# Altium PCB PCB1.PcbDoc
Units mil, origin at the board's own origin, x right, y up, seen from the top; angles counter-clockwise.
Board outline 1597.04 x 1186.19 mil, 2 copper layers (Top Layer, Bottom Layer); 38 components, 34 nets, 161 pads, 103 vias.
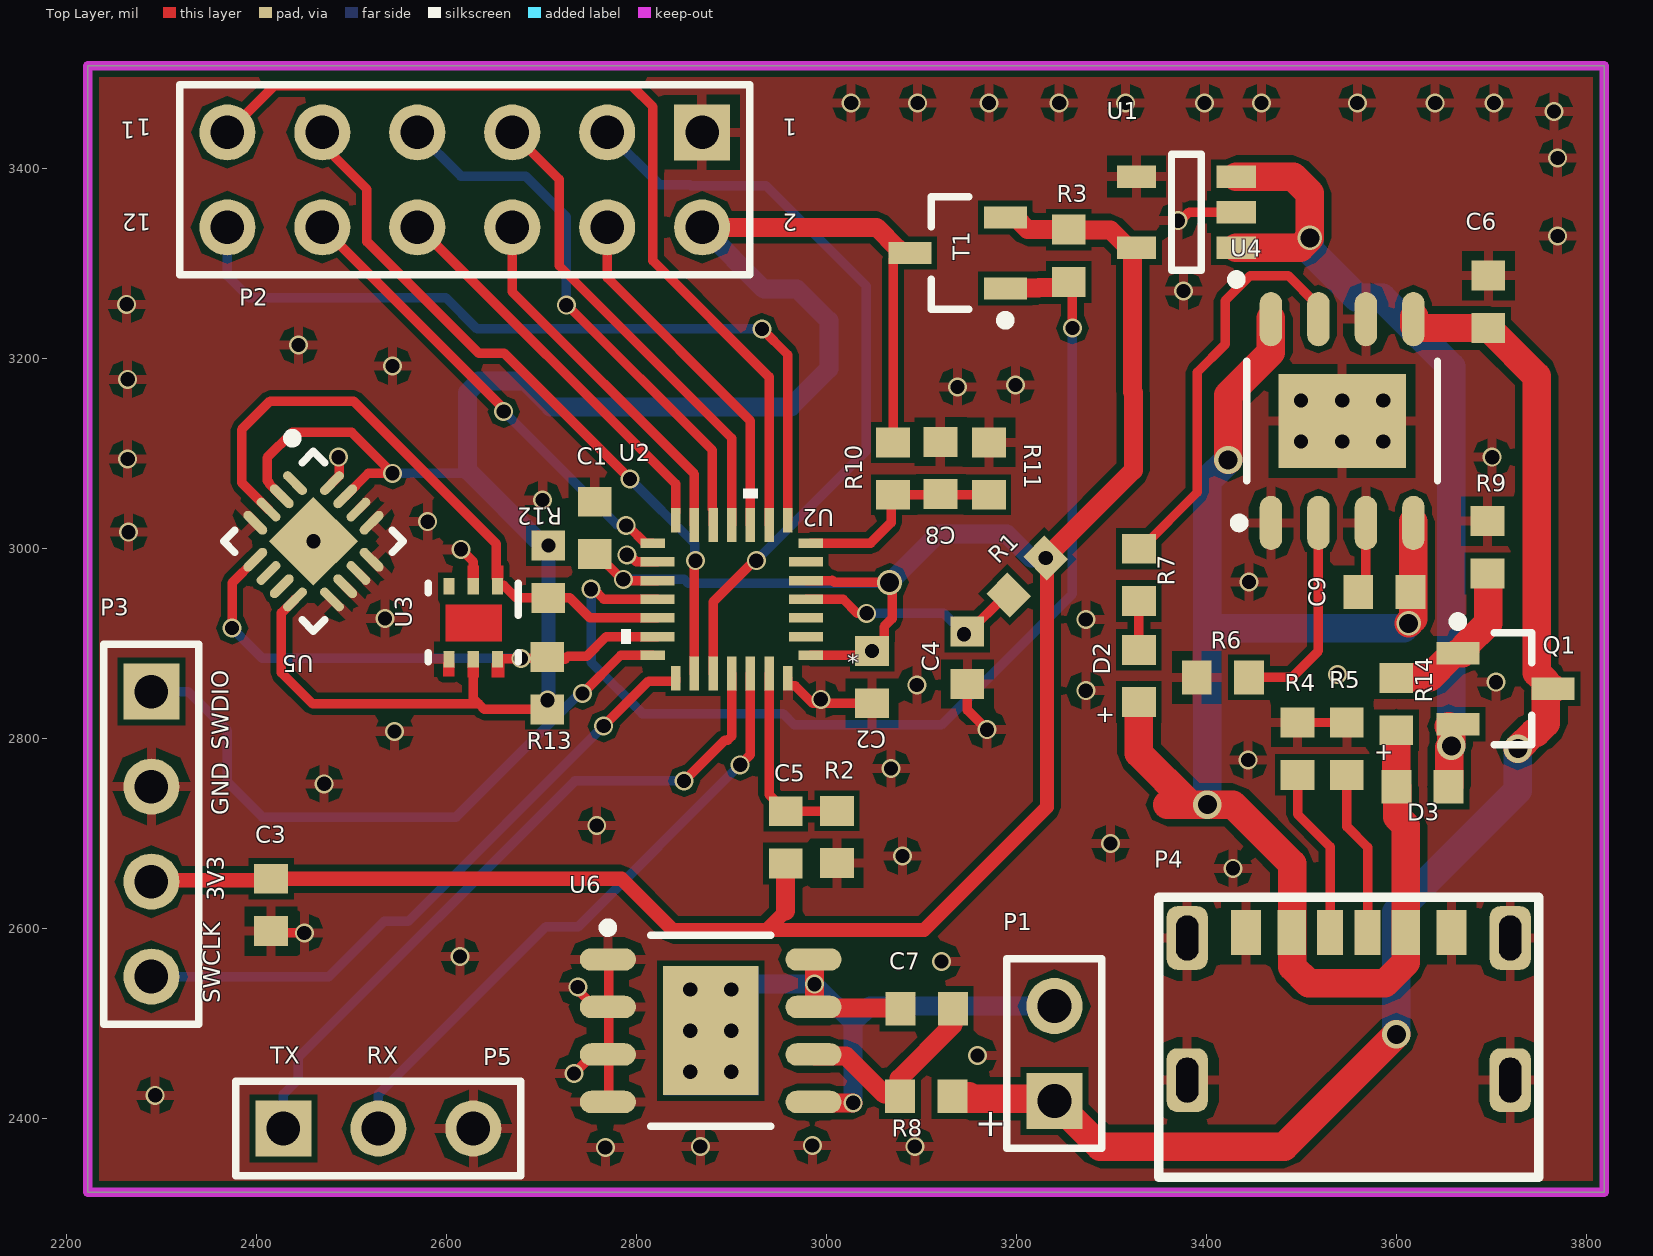
[diagram p0: Top Layer view]
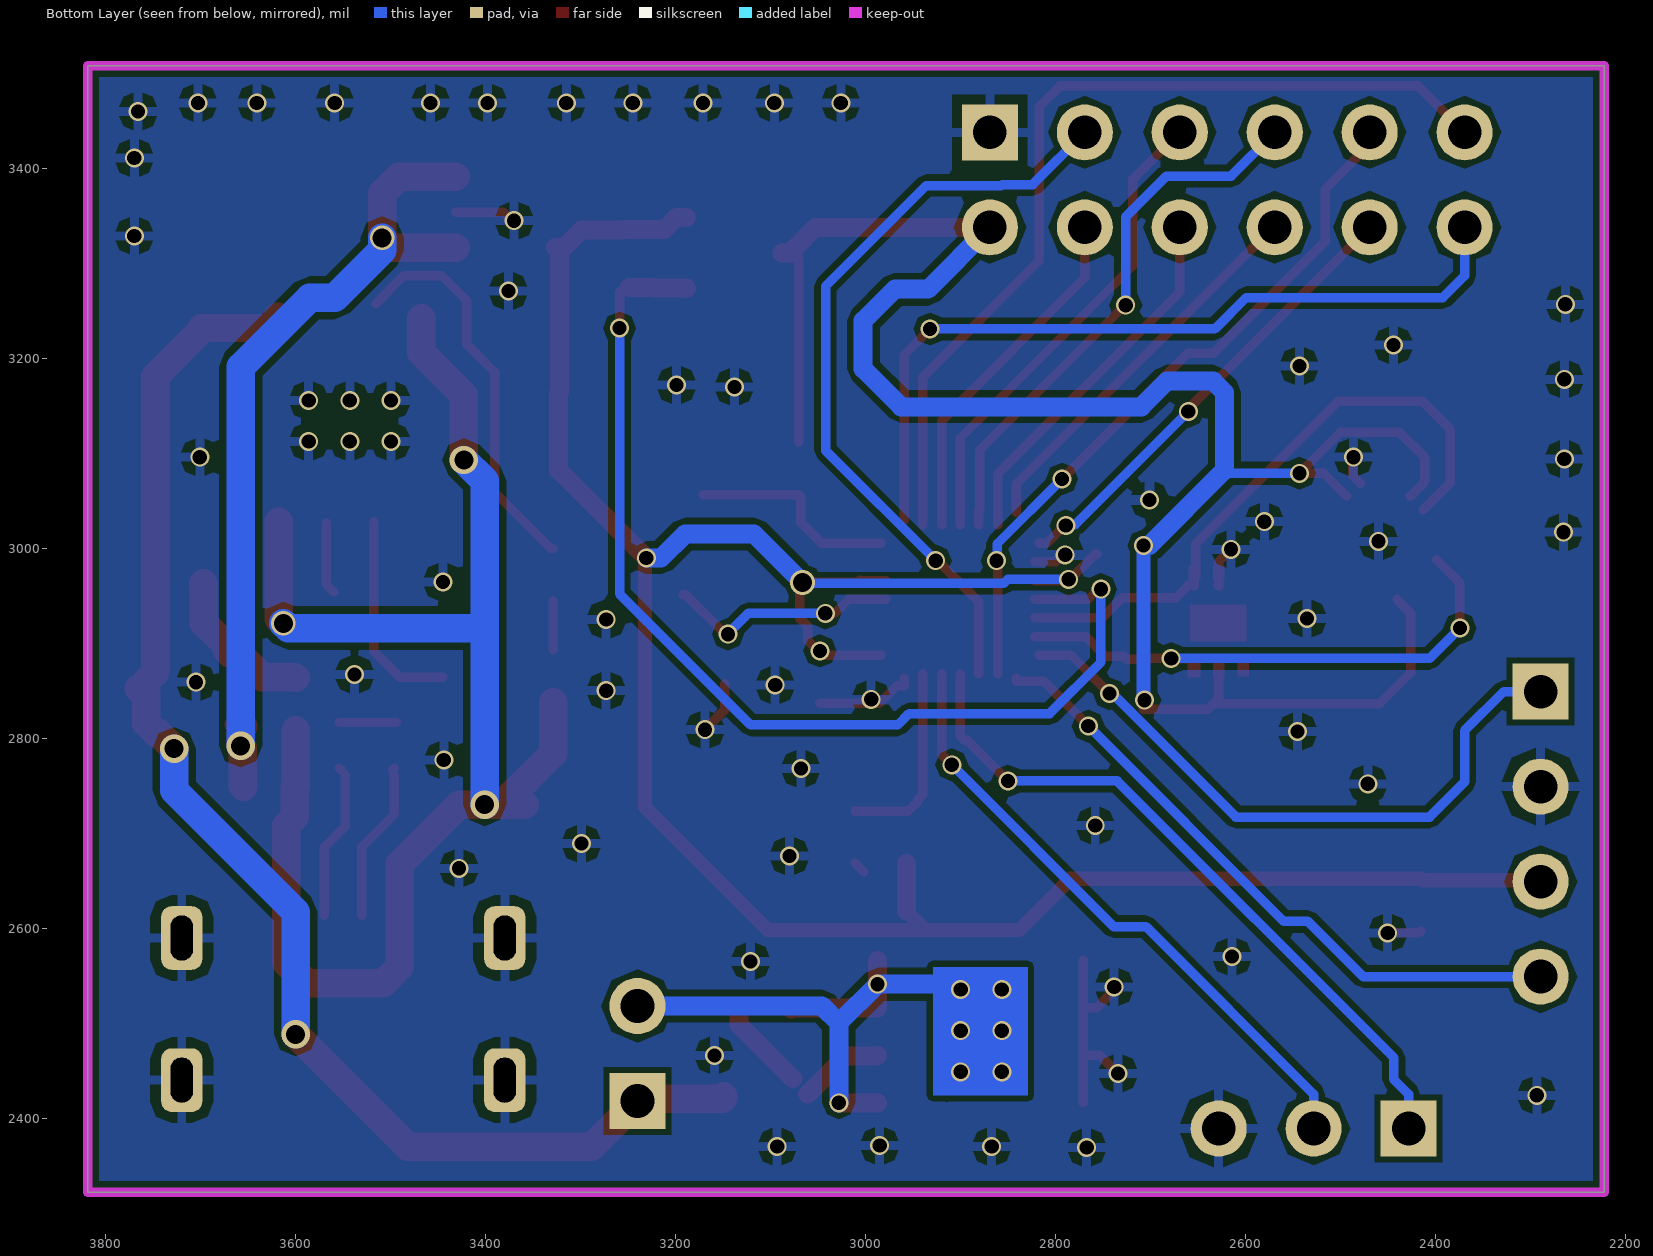
[diagram p1: Bottom Layer view, seen from below]
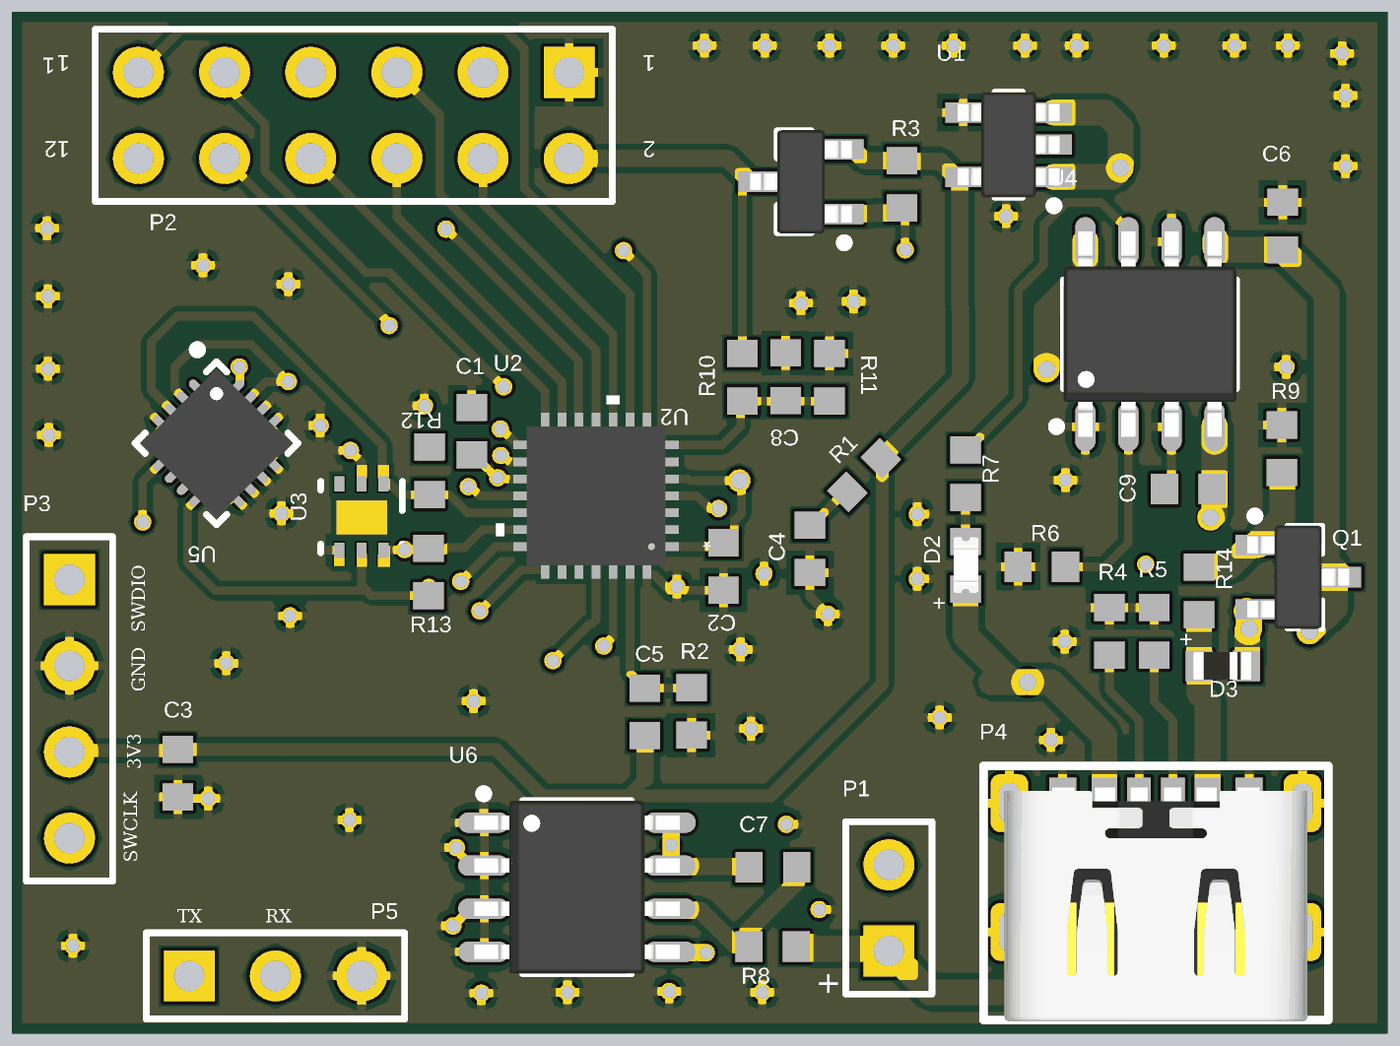
[diagram p2: 3D render of the assembled board from above, using the file's embedded part models]

## Layer stack, top to bottom
Top Solder: solder mask 0.4, Solder Resist, Dk 3.5
Top Layer: signal copper 1.4
Dielectric 1: dielectric 12.6, FR-4, Dk 4.8
Bottom Layer: signal copper 1.4
Bottom Solder: solder mask 0.4, Solder Resist, Dk 3.5

## Board outline
2221.96,2322 2221.96,3508.19 3819,3508.19 3819,2322

## Design rules (kind name [scope] priority, off if disabled: settings)
Clearance [All] p1: gap=6 ignorepadtopadclearanceinfootprint=FALSE
DiffPairsRouting [All] p1: maxlimit=10 minlimit=3 mostfreqgap=10 toplayer_minwidth=15 toplayer_maxwidth=15 toplayer_prefwidth=15 bottomlayer_minwidth=15 bottomlayer_maxwidth=15 bottomlayer_prefwidth=15 maxuncoupledlength=500
PlaneClearance [All] p1: clearance=40
PolygonConnect [All] p1: connectstyle=Relief reliefconductorwidth=10 reliefentries=4 polygonreliefangle="90 Angle" airgapwidth=10
RoutingVias [All] p1: holewidth=28 width=50 viastyle="Through Hole" minholewidth=11.81 minwidth=15.75 maxholewidth=28 maxwidth=50
SolderMaskExpansion [All] p1: expansion=4 istentingtop=FALSE
SupplyNets "Schematic Supply Nets_5" [InNet('USB5V')] p1: voltage=0.000
SupplyNets "Schematic Supply Nets_4" [InNet('GNDBAT')] p2: voltage=0.000
SupplyNets "Schematic Supply Nets_3" [InNet('VBAT')] p3: voltage=0.000
SupplyNets "Schematic Supply Nets_2" [InNet('3V3')] p4: voltage=0.000
SupplyNets "Schematic Supply Nets_1" [InNet('GND')] p5: voltage=0.000
SupplyNets "Schematic Supply Nets" [InNet('TMP_VCC')] p6: voltage=0.000
Width [All] p1: maxlimit=50 minlimit=6 preferedwidth=10
28 further rules are at their usual default settings.

## Components (designator, comment, footprint, x,y, rotation, side; value= is the part's Value field where it differs from the comment)
C1 "Cap" 1608(0603)_C 2755.89,3019.91 r270 top value=100pF
C2 "Cap" 1608(0603)_C 3047.93,2865.93 r90 top value=100pF
C3 "Cap" 1608(0603)_C 2415,2626 r90 top value=100pF
C4 "Cap" 1608(0603)_C 3148.34,2886.27 r90 top value=100pF
C5 "Cap" 1608(0603)_C 2957,2694 r270 top value=100pF
C6 "Cap" 1608(0603)_C 3697,3258 r270 top value=10uF
C7 "Cap" 1608(0603)_C 3107,2515 r0 top value=100nF
C8 "Cap" 1608(0603)_C 3120,3083 r270 top value=100nF
C9 "Cap" 1608(0603)_C 3589,2954 r0 top value=10uF (schematic designator C?)
D2 "LED0" 0603_LED 3328,2866 r90 top
D3 "Diode" 0603_Diode 3630,2749 r0 top
P1 "Header 2" HDR1X2 3240,2418 r90 top
P2 "Header 6X2" HDR2X6 2869,3438 r180 top
P3 "Header 4" HDR1X4 2289,2849 r270 top
P4 "Header 6" Type_C-6P 3441.65,2595.51 r90 top
P5 "Header 3" HDR1X3 2428,2389 r0 top
Q1 "SI2301" SI2301 3715,2852 r0 top
R1 "Res1" 1608(0603)_R 3211.27,2970.41 r45 top value=1K
R2 "Res1" 1608(0603)_R 3011,2696 r90 top value=1K
R3 "Res1" 1608(0603)_R 3255,3308 r270 top value=100K
R4 "Res1" 1608(0603)_R 3496,2789 r90 top value=5.1K
R5 "Res1" 1608(0603)_R 3548,2789 r90 top value=5.1K
R6 "Res1" 1608(0603)_R 3417.44,2864 r180 top value=1K
R7 "Res1" 1608(0603)_R 3329,2972 r270 top value=1K
R8 "Res1" 1608(0603)_R 3105,2423 r180 top value=1K
R9 "Res1" 1608(0603)_R 3696,3001 r270 top value=100K
R10 "Res1" 1608(0603)_R 3070,3084 r90 top value=100K
R11 "Res1" 1608(0603)_R 3171,3084 r270 top value=100K
R12 "Res1" 1608(0603)_R 2707.1,2975.36 r90 top value=10K
R13 "Res1" 1608(0603)_R 2705.69,2857.98 r270 top value=10K
R14 "Res1" 1608(0603)_R 3600,2836 r270 top value=1K
T1 "SI2301" SI2301 3138,3311 r180 top
U1 "XC6220" XC6220 3379,3354 r180 top
U2 "STM32L031G6U6" UFQFPN28-4x4mm-M 2900.14,2946.37 r180 top
U3 "TMP117AIDRVR" DRV0006B 2627.91,2921.62 r270 top
U4 "TP4056" TP4056ESOP 3543,3134 r90 top
U5 "MLX90393" MLX90393 2459.67,3007.41 r315 top
U6 "XB8089A" SOP127P600X175_HS-9N 2878,2492 r0 top

## Footprints (in the part's own frame and the unit in brackets; to place one, negate y for a bottom-side part, rotate by r counter-clockwise, add the part's x,y. Pads: shape width x height; smd on the part's side, far side on the other; paste and mask are expansions set on the pad)
0603_Diode [mm]
  rect 0.8x0.9 smd: 1(-0.762,0) 2(0.638,0)
  body extent -0.93,-0.4 0.77,0.4, height 0.56
0603_LED [mm]
  rect 0.8x0.9 smd: 1(-0.711,-0.025) 2(0.689,-0.025)
  body extent -0.83,-0.39 0.82,0.33, height 0.68
1608(0603)_C [mm]
  rect 0.8x0.9 smd: 1(-0.74,0) 2(0.66,0)
  body extent -0.89,-0.41 0.71,0.39, height 0.9
1608(0603)_R [mm]
  rect 0.8x0.9 smd: 1(-0.7,0) 2(0.7,0)
  body extent -0.83,-0.39 0.77,0.41, height 0.45
DRV0006B [mm]
  rect 0.45x0.3 smd paste+0 mask+0.051: 1(-0.975,0.65) 2(-0.975,0) 3(-0.975,-0.65) 4(0.975,-0.65) 5(0.975,0) 6(0.975,0.65)
  silkscreen extent -1.05,-1.2 1.05,1.2
HDR1X2 [mm] "Connector; Header; 2 Position"
  rect 1.5x1.5 hole 0.9: 1(0,0)
  round 1.5 hole 0.9: 2(2.54,0)
  silkscreen extent -1.27,-1.27 3.81,1.27
HDR1X3 [mm] "Connector; Header; 3 Position"
  rect 1.5x1.5 hole 0.9: 1(0,0)
  round 1.5 hole 0.9: 2(2.54,0) 3(5.08,0)
  silkscreen extent -1.27,-1.27 6.35,1.27
HDR1X4 [mm] "Connector; Header; 4 Position"
  rect 1.5x1.5 hole 0.9: 1(0,0)
  round 1.5 hole 0.9: 2(2.54,0) 3(5.08,0) 4(7.62,0)
  silkscreen extent -1.27,-1.27 8.89,1.27
HDR2X6 [mm] "Connector; Header; 6x2 Position"
  rect 1.5x1.5 hole 0.9: 1(0,0)
  round 1.5 hole 0.9: 2(0,2.54) 3(2.54,0) 4(2.54,2.54) 5(5.08,0) 6(5.08,2.54) 7(7.62,0) 8(7.62,2.54) 9(10.16,0) 10(10.16,2.54) 11(12.7,0) 12(12.7,2.54)
  silkscreen extent -1.27,-1.27 13.97,3.81
MLX90393 [mm] "QFN, 16-Leads, Body 3.00x3.00mm, Pitch 0.50mm, Thermal Pad 1.68x1.68mm, IPC Medium Density"
  oval 0.8x0.25 smd: 1(-1.45,0.75) 2(-1.45,0.25) 3(-1.45,-0.25) 4(-1.45,-0.75) 9(1.45,-0.75) 10(1.45,-0.25) 11(1.45,0.25) 12(1.45,0.75)
  oval 0.25x0.8 smd: 5(-0.75,-1.45) 6(-0.25,-1.45) 7(0.25,-1.45) 8(0.75,-1.45) 13(0.75,1.45) 14(0.25,1.45) 15(-0.25,1.45) 16(-0.75,1.45)
  rect 1.68x1.68 smd: 17(0,0)
  silkscreen extent -2.47,-1.7 1.7,1.7, body extent -1.55,-1.55 1.55,1.55, height 1
SI2301 [mm] "SOT23, 3-Leads, Body 2.92x2.80mm, Pitch 0.95mm, IPC Medium Density"
  rect 1.15x0.6 smd: 1(-1.275,0.95) 2(-1.275,-0.95) 3(1.275,0)
  silkscreen extent -1.4,-1.5 0.7,1.92, body extent -1.5,-1.52 1.5,1.52, height 1.1
SOP127P600X175_HS-9N [mm] "SOP, 8-Leads, Body 4.90x3.90mm, Pitch 1.27mm, Thermal Pad 3.45x2.56mm, IPC Medium Density"
  oval 1.5x0.6 smd: 1(-2.75,1.905) 2(-2.75,0.635) 3(-2.75,-0.635) 4(-2.75,-1.905) 5(2.75,-1.905) 6(2.75,-0.635) 7(2.75,0.635) 8(2.75,1.905)
  rect 2.56x3.45 smd: 9(0,0)
  silkscreen extent -2.87,-2.55 1.6,2.88, body extent -3.03,-2.55 3.03,2.55, height 1.75
TP4056ESOP [mm] "SOP, 8-Leads, Body 4.90x3.90mm, Pitch 1.27mm, Thermal Pad 3.41x2.52mm, IPC Medium Density"
  oval 1.45x0.6 smd: 1(-2.725,1.905) 2(-2.725,0.635) 3(-2.725,-0.635) 4(-2.725,-1.905) 5(2.725,-1.905) 6(2.725,-0.635) 7(2.725,0.635) 8(2.725,1.905)
  rect 2.52x3.41 smd: 9(0,0)
  silkscreen extent -2.85,-2.55 1.6,2.88, body extent -3.03,-2.55 3.03,2.55, height 1.75
Type_C-6P [mm]
  rect 1.2x0.8 smd: 1(0,0) 6(0,-5.5)
  rect 1.2x0.76 smd: 2(0,-1.23) 5(0,-4.27)
  rect 1.2x0.7 smd: 3(0,-2.25) 4(0,-3.25)
  rrect50% 1.7x1.1 hole 0.6 slot 1.2 at 0 deg: ""(-3.95,1.57) ""(-3.95,-7.07) ""(-0.15,1.57) ""(-0.15,-7.07)
  silkscreen extent -6.55,-7.83 0.95,2.33, body extent -6.59,-7.22 0.31,1.72, height 3.18
UFQFPN28-4x4mm-M [mm]
  rect 0.654x0.255 smd paste+0 mask+0: 1(-2.118,1.5) 7(-2.118,-1.5) 15(2.118,-1.5) 21(2.118,1.5)
  rect 0.908x0.255 smd paste+0 mask+0: 2(-1.991,1) 3(-1.991,0.5) 4(-1.991,0) 5(-1.991,-0.5) 6(-1.991,-1) 16(1.991,-1) 17(1.991,-0.5) 18(1.991,0) 19(1.991,0.5) 20(1.991,1)
  rect 0.255x0.654 smd paste+0 mask+0: 8(-1.5,-2.118) 14(1.5,-2.118) 22(1.5,2.118) 28(-1.5,2.118)
  rect 0.255x0.908 smd paste+0 mask+0: 9(-1,-1.991) 10(-0.5,-1.991) 11(0,-1.991) 12(0.5,-1.991) 13(1,-1.991) 23(1,1.991) 24(0.5,1.991) 25(0,1.991) 26(-0.5,1.991) 27(-1,1.991)
  silkscreen extent -0.69,-2.95 2.95,1.19, body extent -2.05,-2.04 2.04,2.04, height 0.61
XC6220 [mm] "SOT23, 5-Leads, Body 2.90x2.80mm, Pitch 0.95mm, IPC Medium Density"
  rect 1.05x0.6 smd: 1(-1.335,0.95) 2(-1.335,0) 3(-1.335,-0.95) 4(1.335,-0.95) 5(1.335,0.95)
  silkscreen extent -1.46,-1.55 0.4,1.92, body extent -1.5,-1.55 1.5,1.55, height 1.1

## Part data
C1 C2 C3 C4 C5 C6 C7 C8 C9: "Capacitor", LatestRevisionDate=17-Jul-2002, LatestRevisionNote="Re-released for DXP Platform.", PackageDescription="Radial Cap, Thru-Hole; 2 Leads; 0.3 in Pin Spacing", PackageReference=RAD-0.3, Published=8-Jun-2000, Publisher="Altium Limited"
D2: "Typical INFRARED GaAs LED", LatestRevisionDate=08-Jul-2005, LatestRevisionNote="Mech Layer 1 removed.", PackageDescription="LED; 2 Leads", PackageReference=LED-0, Published=8-Jun-2000, Publisher="Altium Limited"
D3: "Default Diode", Code_JEDEC=DO-214-AB, LatestRevisionDate=17-Jul-2002, LatestRevisionNote="Re-released for DXP Platform.", PackageDescription="DO-214-AB/SMC; 2 C-Bend Leads; Body 7.9 x 5.9 mm, inc. leads (LxW)", PackageReference=SMC, PackageVersion=Sep-1996, Published=8-Jun-2000, Publisher="Altium Limited"
P1: "Header, 2-Pin", LatestRevisionDate=17-Jul-2002, LatestRevisionNote="Re-released for DXP Platform.", Publisher="Altium Limited"
P2: "Header, 6-Pin, Dual row", LatestRevisionDate=17-Jul-2002, LatestRevisionNote="Re-released for DXP Platform.", Publisher="Altium Limited"
P3: "Header, 4-Pin", LatestRevisionDate=17-Jul-2002, LatestRevisionNote="Re-released for DXP Platform.", Publisher="Altium Limited"
P4: "Header, 6-Pin", LatestRevisionDate=17-Jul-2002, LatestRevisionNote="Re-released for DXP Platform.", Publisher="Altium Limited"
P5: "Header, 3-Pin", LatestRevisionDate=17-Jul-2002, LatestRevisionNote="Re-released for DXP Platform.", Publisher="Altium Limited"
Q1: library part PMOS-2, "P-Channel Power MOSFET", ComponentLink1Description="Manufacturer Link", ComponentLink1URL=http://www.irf.com/, DatasheetVersion=PD-9.390D, LatestRevisionDate=17-Jul-2002, LatestRevisionNote="Re-released for DXP Platform.", Note="Pin 4 not drawn and electrically connected to Pin 2.", PackageDescription="TO, Thru-Hole, Vertical, Heatsink Mounted; 3 In-Line Leads; Pitch 2.54 mm", PackageReference=TO-220AB, PackageVersion=Feb-1997, Published=8-Jun-2000, Publisher="Altium Limited"
R1 R2 R3 R4 R5 R6 R7 R8 R9 R10 R11 R12 R13 R14: "Resistor", LatestRevisionDate=17-Jul-2002, LatestRevisionNote="Re-released for DXP Platform.", PackageDescription="Axial Device, Thru-Hole; 2 Leads; 0.3 in Pin Spacing", PackageReference=AXIAL-0.3, Published=8-Jun-2000, Publisher="Altium Limited"
T1 U1 U4: library part Component_1
U2: "Ultra-low-power Arm Cortex-M0+ MCU with 32-Kbytes of Flash memory, 32 MHz CPU", Manufacturer_Name=STMicroelectronics, Copyright="Copyright (C) 2025 Ultra Librarian. All rights reserved.", Manufacturer_Part_Number=STM32L031G6U6, RefDes=RefDes, Type=Type
U3: "0.1Â°C digital temperature sensor, 48-bit EEPROM, PT100/PT1000 RTD replacement 6-WSON -55 to 150", Manufacturer_Name="Texas Instruments", Copyright="Copyright (C) 2026 Ultra Librarian. All rights reserved.", Manufacturer_Part_Number=TMP117AIDRVR, RefDes=RefDes, Type=TYPE

## Via types
v1: diameter 20, hole 15, Top Layer to Bottom Layer, 95 vias
v2: diameter 30, hole 20, Top Layer to Bottom Layer, 5 vias
v3: diameter 26, hole 20, Top Layer to Bottom Layer, 3 vias

## Nets (pads, with @x,y where several pads share a name; then routed paths per layer and width w, separated by ;. In a path a pad name is that pad's centre, name@x,y a point inside that pad or via, vN(x,y) a via of type N, cw(c..) or ccw(c..) an arc to the next point about the centre after c; other vN are vias at no path point)
3V3: C1.2 C2.2 C3.2 C5.2 P3.3 R1.2 R3.1 T1.2 U1.5 U2.1 U2.5 U2.17 | length 2662
  Top Layer w10: C1.2 2757.86,2993.91 2784.4,2967.37 v1(2786,2967.37) ; v1@2786,2967 2787.08,2967 2788.02,2966.06 U2.17 ; U2.5 3006.11,2966.07 3006.21,2966.17 3008.33,2964.05 v3(3066.35,2964.05) 3069,2961.4 3069,2926 3060.64,2917.64 3060.64,2902.67 3049.9,2891.93 v1(3047.93,2891.93) 3043.32,2887.32 U2.1
  Top Layer w15: P3.3 2290.5,2650.5 2413.5,2650.5 C3.2 2784,2652 2838,2598 2937,2598 ; 2957,2618 2937,2598 ; v1(3230.76,2989.9) 3232.15,2988.51 3232.15,2727.52 3102.63,2598 2937,2598
  Top Layer w20: 2957,2618 C5.2 ; T1.2 3199.02,3348.4 3211.87,3335.56 R3.1 3255.56,3335 3299.18,3335 3317.58,3316.6 U1.5@3322.44,3316.6 ; v1(3230.76,2989.9) 3323,3082.15 3323,3164 3322.44,3164.56 U1.5@3322.44,3316.6 ; U1.5 U1.5@3322.44,3316.6
  Bottom Layer w10: v1(2786,2967.37) 2850.19,2967.37 2854.56,2963 3064.22,2963 3065.27,2964.05 v3(3066.35,2964.05)
  Bottom Layer w20: v3@3073.56,2971.26 3117.3,3015 3190,3015 3215.1,2989.9 v1(3230.76,2989.9)
5V: D3.2 Q1.2 U1.1 U1.3 | length 901.9
  Top Layer w20: Q1.2@3655.12,2812.79 3656.93,2814.6 Q1.2
  Top Layer w30: U1.1 3498.6,3316.6 v3(3509,3327) 3509,3373.83 3491.43,3391.4 U1.3 ; D3.2 3655.87,2749.75 3655.87,2789.87 v2(3658,2792) 3658,2809.91 Q1.2@3655.12,2812.79
  Bottom Layer w30: v3(3509,3327) 3509,3314 3559,3264 3585,3264 3658,3191 v2(3658,2792)
ADC_IN1: C8.2 R10.1 R11.2 U2.7 | length 224.7
  Top Layer w10: U2.7 3046.43,3005.43 3068,3027 3068,3054.44 R10.1 3120,3056.44 R11.2
BOOT0: C5.1 R2.2 U2.27 | length 207.5
  Top Layer w10: U2.27 2939.51,2740.61 2944.28,2735.83 2944.28,2733.87 2955.03,2723.12 C5.1 3010.56,2723.12 R2.2
BUSY: P2.9 U2.23 | length 749.1
  Top Layer w10: P2.9 2469,3425 2515.92,3378.08 2515.92,3323.08 2633.5,3205.5 2660.5,3205.5 v1(2793,3073) ; U2.23 2860.77,2984.69 2862,2985.92 v1(2862,2987)
  Bottom Layer w10: v1(2793,3073) 2861.23,3004.77 2861.23,2987.77 v1(2862,2987)
DIO1: P2.8 U2.14 | length 413.9
  Top Layer w10: P2.8 2571,3338 2841.09,3067.91 U2.14@2841.09,3038
DIO2: P2.10 U2.15 | length 487.3
  Top Layer w10: P2.10 2659.23,3147.77 2659.23,3144.77 v1(2660,3144) ; v1(2789,3024) 2789.77,3023.23 2791.1,3023.23 2808.91,3005.43 U2.15
  Bottom Layer w10: v1(2660,3144) 2779.23,3024.77 2788.23,3024.77 v1(2789,3024)
GND: C1.1 C2.1 C3.1 C4.1 C6.1 C8.1 C9.1 P2.1 P3.2 P4. P4.1 P4.6 P5.3 R2.1 R4.2 R5.2 R6.2 R9.1 R11.1 U1.2 U1.4 U2.16 U2.28 U3.2 U3.4 U4.1 U4.3 U4.6 U4.9 U5.4 U5.9 U5.10 U5.11 U5.12 U5.13 U5.14 U5.16 U5.17 U6.1 U6.2 U6.3 U6.4 | length 765.7
  Top Layer w10: C3.1 2416.88,2595 v1(2450,2595) ; U5.16 2486.71,3076.2 2486.71,3095.29 v1(2486,3096) ; U3.4@2601.41,2879.38 2601.41,2882.33 U3.4 ; v1(2615,2999) 2627.91,2986.09 U3.2 U3.2@2628.81,2960.92 ; v1(2734,2447) 2753,2466 U6.3@2770.73,2466 ; v1(2738,2538) 2738,2534.7 2756.7,2516 U6.2@2770.73,2516 ; U6.4@2770.73,2416 U6.3@2770.73,2466 ; U6.1@2770.73,2566 U6.2@2770.73,2516 ; v1(2789.61,2993.12) 2792.32,2993.12 2799.68,2985.76 U2.16@2821.75,2985.76 ; U2.28@2959.21,2855.12 2967.07,2855.12 2985.39,2836.81 C2.1 ; U2.28@2959.2,2855.14 U2.28 ; R2.1@3001.95,2659.39 R2.1 ; C4.1 3148.34,2829.66 v1(3169,2809) ; v1(3370,3345) 3372.71,3345 3381.71,3354 U1.2 ; v1(3376,3271) v1@3376.5,3271.5 ; R4.2@3494.03,2816.56 R4.2 R5.2 R5.2@3554,2816.56 ; C9.1 3568,2962.12 U4.3 ; U6.3@2770.73,2466 U6.2@2770.73,2516
  other v1: 2767,2369 2867,2370 3093,2370 2985,2371 2293,2424 3159,2466 3121,2565 2614,2570 3428,2663 3080,2676 3299,2689 2758,2708 2471,2752 3068,2768 3444,2777 2545,2807 2994,2841 3273,2850 3095,2856 3705,2859 3538,2867 3273,2925 2535,2926 3445,2964.58 2459.67,3007.41 2265,3017 2580,3028 2701,3051 2264,3094 3701,3096 3499.69,3112.35 3543,3112.35 3586.31,3112.35 3499.69,3155.65 3543,3155.65 3586.31,3155.65 3138,3170 3199,3172 2264,3178 2543,3192 2444,3214 2263,3257 3770,3329 3770,3411 3766,3460 3026,3469 3096,3469 3171,3469 3245,3469 3315,3469 3398,3469 3458,3469 3559,3469 3641,3469 3703,3469
GNDBAT: C7.1 P1.2 U6.5 U6.7 U6.8 U6.9 | length 651.7
  Top Layer w20: U6.5@2987.27,2416 v1(3028,2416) ; U6.8@2987.27,2566 v1(2987.27,2541) 2987.27,2516 3076.88,2516 C7.1
  Bottom Layer w20: v1@2900.65,2447.69 2914.35,2434 ; v1@2900.65,2534.31 2907.35,2541 v1(2987.27,2541) 3028,2500.27 ; v1(3028,2416) 3028,2500.27 ; P1.2 3045.73,2518 3028,2500.27
  other v1: 2856.35,2448.69 2899.65,2448.69 2856.35,2492 2899.65,2492 2856.35,2535.31 2899.65,2535.31
I2C1_SCL: R12.1 U2.19 U3.1 U5.3 | length 660.2
  Top Layer w10: U5.3 2384,3069.16 2384,3125 2414,3155 2502,3155 2652,3005 2652,2976 2653.5,2974.5 U3.1 ; 2659.91,2961.09 2673.2,2947.8 R12.1 2729.73,2947.8 2750.85,2926.69 U2.19
I2C1_SDA: R13.1 U2.20 U3.6 U5.5 | length 579.7
  Top Layer w10: v1(2374,2916) 2374,2963.49 U5.5 ; U3.6 2653.88,2883.62 2677.62,2883.62 v1(2678,2884) 2700.93,2884 2702.93,2886 2705.69,2883.24 2724.6,2883.24 2727.61,2886.25 2747.25,2886.25 2768,2907 U2.20
  Bottom Layer w10: v1(2374,2916) 2406,2884 v1(2678,2884)
NetC7_2: C7.2 R8.2 U6.6 | length 187.4
  Top Layer w20: U6.6@2987.27,2466 2987.96,2465.31 3020.69,2465.31 3060.78,2425.23 ; 3076.41,2441.41 3133,2498 C7.2
NetD2_2: D2.2 R7.2 | length 51.3
  Top Layer w10: D2.2 R7.2
NetP4_3: P4.3 R4.1 | length 165
  Top Layer w10: R4.1 3496,2720 3530.39,2685.61 P4.3@3530.39,2613.51 ; R4.1@3496,2768.44 R4.1@3498,2766.44
NetP4_4: P4.4 R5.1 | length 160.1
  Top Layer w10: R5.1 3548,2707 3569.76,2685.24 P4.4@3569.76,2613.51 ; R5.1@3551.76,2766.2 R5.1@3554,2768.44
NetQ1_1: Q1.1 R9.2 R14.1 | length 156.3
  Top Layer w30: R14.1 3600.75,2864.31 3635.26,2864.31 Q1.1@3657.17,2886.21 ; Q1.1 3669.25,2889.4 3672.44,2892.59 3672.44,2897.04 3696.69,2921.29 3696.69,2962.25 R9.2@3697.44,2963
NetR6_1: R6.1 U4.2 | length 220.3
  Top Layer w10: R6.1 3490,2864 3518,2892 U4.2@3518,3027.72
NetR7_1: R7.1 U4.7 | length 418.8
  Top Layer w10: R7.1 3330.97,2999.56 3390.41,3059 3390.41,3185.41 3419.67,3214.67 3419.67,3260.67 3446,3287 3486.33,3287 U4.7@3515.6,3257.73
NRST: C4.2 R1.1 U2.4 | length 245.3
  Top Layer w10: U2.4 3017.52,2946.37 3032.37,2931.52 v1(3042.27,2931.52) ; v1(3144.8,2909.6) 3147.64,2909.6 3188.96,2950.93 R1.1
  Bottom Layer w10: v1(3042.27,2931.52) 3123.61,2931.52 v1@3144.82,2910.31
NRST_LORA: P2.3 U2.24 | length 818.2
  Top Layer w10: U2.24 2880.46,2943.46 2924,2987 v1(2926,2987) v1@2928,2987
  Bottom Layer w10: P2.3 2824,3383 2856,3383 2857,3382 2936,3382 3042,3276 3042,3103 v1(2926,2987)
RXEN: P2.12 U2.8 | length 849.7
  Top Layer w10: v1(2932,3231) 2959.2,3203.8 U2.8
  Bottom Layer w10: P2.12 2369,3287 2392,3264 2599,3264 2632,3231 v1(2932,3231)
SPI1_MISO: P2.7 U2.12 | length 582.7
  Top Layer w10: v1(2726,3256) 2727,3256 2879.65,3103.35 2879.65,3041.38 2880.44,3040.58 U2.12@2880.44,3024.76
  Bottom Layer w10: P2.7 2615,3392 2683,3392 2726,3349 v1(2726,3256)
SPI1_MOSI: P2.6 U2.13 | length 392.7
  Top Layer w10: P2.6 2669,3270 2860.77,3078.23 U2.13
SPI1_NSS: P2.4 U2.10 | length 375.7
  Top Layer w10: P2.4 2769,3285 2919.83,3134.17 U2.10
SPI1_SCK: P2.5 U2.11 | length 509
  Top Layer w10: P2.5 2718.47,3388.53 2718.47,3297.53 2900.14,3115.86 U2.11
SWCLK: P3.4 U2.22 | length 683.8
  Top Layer w10: v1(2765.25,2812.75) 2812.59,2860.1 U2.22@2841.07,2860.1 ; U2.22@2841.09,2860.11 U2.22
  Bottom Layer w10: P3.4 2476,2549 2534,2607 2559.49,2607 v1(2765.25,2812.75)
SWDIO: P3.1 U2.21 | length 684.6
  Top Layer w10: v1(2743,2847) 2783.32,2887.32 U2.21
  Bottom Layer w10: P3.1 2328,2849 2369,2808 2369,2754 2406,2717 2609.96,2717 2739.96,2847 v1(2743,2847)
TMP_CTRL: R3.2 T1.1 U2.18 | length 1133.7
  Top Layer w10: v1(2752,2957) 2754.71,2957 2765.33,2946.37 U2.18 ; R3.2@3249.25,3274.69 3254,3274.69 3259,3269.69 v1(3259,3232)
  Top Layer w20: T1.1 3188.6,3274 3223,3274 3223.69,3274.69 R3.2@3249.25,3274.69
  Bottom Layer w10: v1(2752,2957) 2752,2880 2806,2826 2954,2826 2966,2814 3121,2814 3259,2952 v1(3259,3232)
TMP_VCC: P2.2 R10.2 R12.2 R13.2 T1.3 U3.5 U5.2 U5.8 U5.15 | length 2231.3
  Top Layer w10: U5.2 2413,3068 2413,3069 2410.89,3071.11 2410.89,3095.46 2437.42,3122 2500,3122 v1(2543,3079) 2517.35,3079 U5.15 ; U5.8 2426,2931.97 2426,2869 2458.74,2836.26 2633.74,2836.26 ; U3.5 2627.91,2842.09 2633.74,2836.26 ; R12.2@2696.35,3013.67 v1(2707.1,3002.92) ; R13.2@2707.66,2830.43 R13.2 2639.57,2830.43 2633.74,2836.26 ; R10.2 3070,3298.33 3070.17,3298.5 3070.17,3304.19 3076.98,3311 T1.3@3079.68,3311
  Top Layer w20: P2.2 3052.68,3338 3075.17,3315.52 3075.17,3312.81 3076.98,3311 T1.3
  Bottom Layer w10: v1(2543,3079) 2619,3079 2622,3082 ; v1(2706,2840) 2706.77,2840.77 2706.77,2843.59 v1@2707.1,2843.93
  Bottom Layer w15: v1@2707.1,2843.93 v1(2707.1,3002.92)
  Bottom Layer w20: v1(2707.1,3002.92) 2701.08,3002.92 2622,3082 2622,3164.28 2633.72,3176 2682.5,3176 2709.5,3149 2962.33,3149 3002.33,3189 3002.33,3239.67 2969,3273 2934,3273 P2.2
TXEN: P2.11 U2.9 | length 968.5
  Top Layer w10: P2.11 2418,3487 2795.14,3487 2817,3465.14 2817,3303 2939.51,3180.49 U2.9
USART2_RX: P5.2 U2.26 | length 663.7
  Top Layer w10: v1(2909,2772) 2919.83,2782.83 U2.26
  Bottom Layer w10: P5.2@2528,2386.55 P5.2 2528,2425 2704.66,2601.66 2738.66,2601.66 v1(2909,2772)
USART2_TX: P5.1 U2.25 | length 743.7
  Top Layer w10: v1(2850,2755) 2893,2798 2896,2798 2900.14,2802.14 U2.25
  Bottom Layer w10: P5.1 2428,2425 2443.67,2440.67 2443.67,2463.67 2735,2755 v1(2850,2755)
USB5V: C9.2 D2.1 D3.1 P4.2 P4.5 R14.2 U4.4 U4.8 | length 1643.1
  Top Layer w30: D2.1 3329,2784 3383,2730 ; 3359,2730 3383,2730 ; v2(3423,3093) 3423,3161.43 3468,3206.43 U4.8@3468,3242.28 ; R14.2 D3.1 3600.75,2748.25 3600.75,2717.12 3609.92,2707.95 P4.5@3609.92,2613.51 ; P4.5@3609.88,2613.47 3609.88,2563.88 3588,2542 3507.81,2542 3490.24,2559.57 3490.24,2613.51 3490.24,2667.76 3428,2730 v2(3401,2730) 3383,2730 ; v3(3613,2921) 3618,2926 U4.4@3618,3027.72
  Bottom Layer w30: v2(3401,2730) 3401,2916 ; v2(3423,3093) 3401,3071 3401,2916 ; v3(3613,2921) 3608,2916 3401,2916
VBAT: C6.2 P1.1 Q1.3 R8.1 U4.5 | length 1455.1
  Top Layer w30: 3149.56,2423 3149.56,2421.25 3150.31,2420.5 3237.5,2420.5 P1.1 3288,2370 3482,2370 v2(3600,2488) ; U4.5@3619,3244 3619,3234.19 3621.19,3232 C6.2 3698.97,3232 3699.72,3231.25 3699.72,3229.28 3748,3181 3748,2869.2 3757.56,2859.64 3757.56,2855.19 Q1.3@3760.75,2852 ; v2(3728,2789) 3745,2806 3747.62,2806 3757.56,2815.94 3757.56,2848.81 Q1.3@3760.75,2852 ; Q1.3 Q1.3@3760.75,2852
  Bottom Layer w30: v2(3600,2488) 3600,2617 3728,2745 v2(3728,2789)
pads on no net: U2.2 U2.3 U2.6 U3.3 U5.1 U5.6 U5.7

## Polygon pours and split planes (outlines as drawn)
GND on Bottom Layer "Bottom Layer-GND" (solid, remove dead copper, pour order 0): 2222.5,2323 3817.5,2323 3817.5,3510 2222.5,3510
GND on Top Layer "Bottom Layer-GND" (solid, remove dead copper, pour order 1): 2222.26,2323 3815.74,2323 3815.74,3509 2222.26,3509

## Keep-outs
Keep-Out Layer:
  the board outline again, w10

## Other copper
Top Layer:
  rectangle net GND: 2596,2865 2608,2880
  rectangle net TMP_VCC: 2622,2864 2634,2879
  rectangle net I2C1_SDA: 2647,2864 2661,2879
  rectangle net I2C1_SCL: 2647,2967 2660,2982
  rectangle net GND: 2622,2967 2634,2982
  rectangle: 2598.94,2901.63 2658,2941
Bottom Layer:
  rectangle net GNDBAT: 2829,2424 2929,2559

## Silkscreen, mask and mechanical layers (free items; w line width, h text height)
Top Overlay:
  text "SWDIO" at 2376.35,2788 h30 r90
  text "GND" at 2376.35,2719 h30 r90
  text "3V3" at 2371.35,2629 h30 r90
  text "SWCLK" at 2367.35,2521 h30 r90
  text "TX" at 2414,2451.42 h30
  text "RX" at 2516,2451.42 h30
  text "+" at 3156,2370.57 h50
Top Solder:
  rectangle: 2645,2864 2662,2879
  rectangle: 2620,2864 2636,2879
  rectangle: 2594,2865 2610,2880
  rectangle: 2620,2967 2636,2982
  rectangle: 2645,2967 2662,2982
  rectangle: 2598.94,2901.63 2658,2941
Mechanical 1:
  lines w10: 3818,2322 2222,2322 2222,3508 3818,3508 3818,2322 ; 3818,2322 2223.4,2322 2223.4,3509.39 3818,3509.39 3818,2322

## Text inside footprints (layer, text, board x,y; h text height)
D2: Top Overlay "+" at 3307.1,2814 h30 r90
D3: Top Overlay "+" at 3577,2770.9 h30
P2: Top Overlay "2" at 2969,3358 h30 r180; Top Overlay "1" at 2969,3458 h30 r180; Top Overlay "1" at 2289,3458 h30 r180; Top Overlay "1" at 2272,3455 h30 r180; Top Overlay "12" at 2289,3358 h30 r180
U2: Top Overlay "*" at 3033.89,2902.47 h30 r180; Mechanical 13 "*" at 2973.14,2902.48 h50 r180